# Altium PCB OFP_MCM_v1.61.PcbDoc (part 6 of 8)
Units mil, origin at the board's own origin, x right, y up, seen from the top; angles counter-clockwise.
Board outline 4330.71 x 4724.41 mil, 4 copper layers (Top Layer, Layer 1, Layer 2, Bottom Layer), stack 62.047 mil thick; 384 components, 287 nets, 1339 pads, 554 vias.
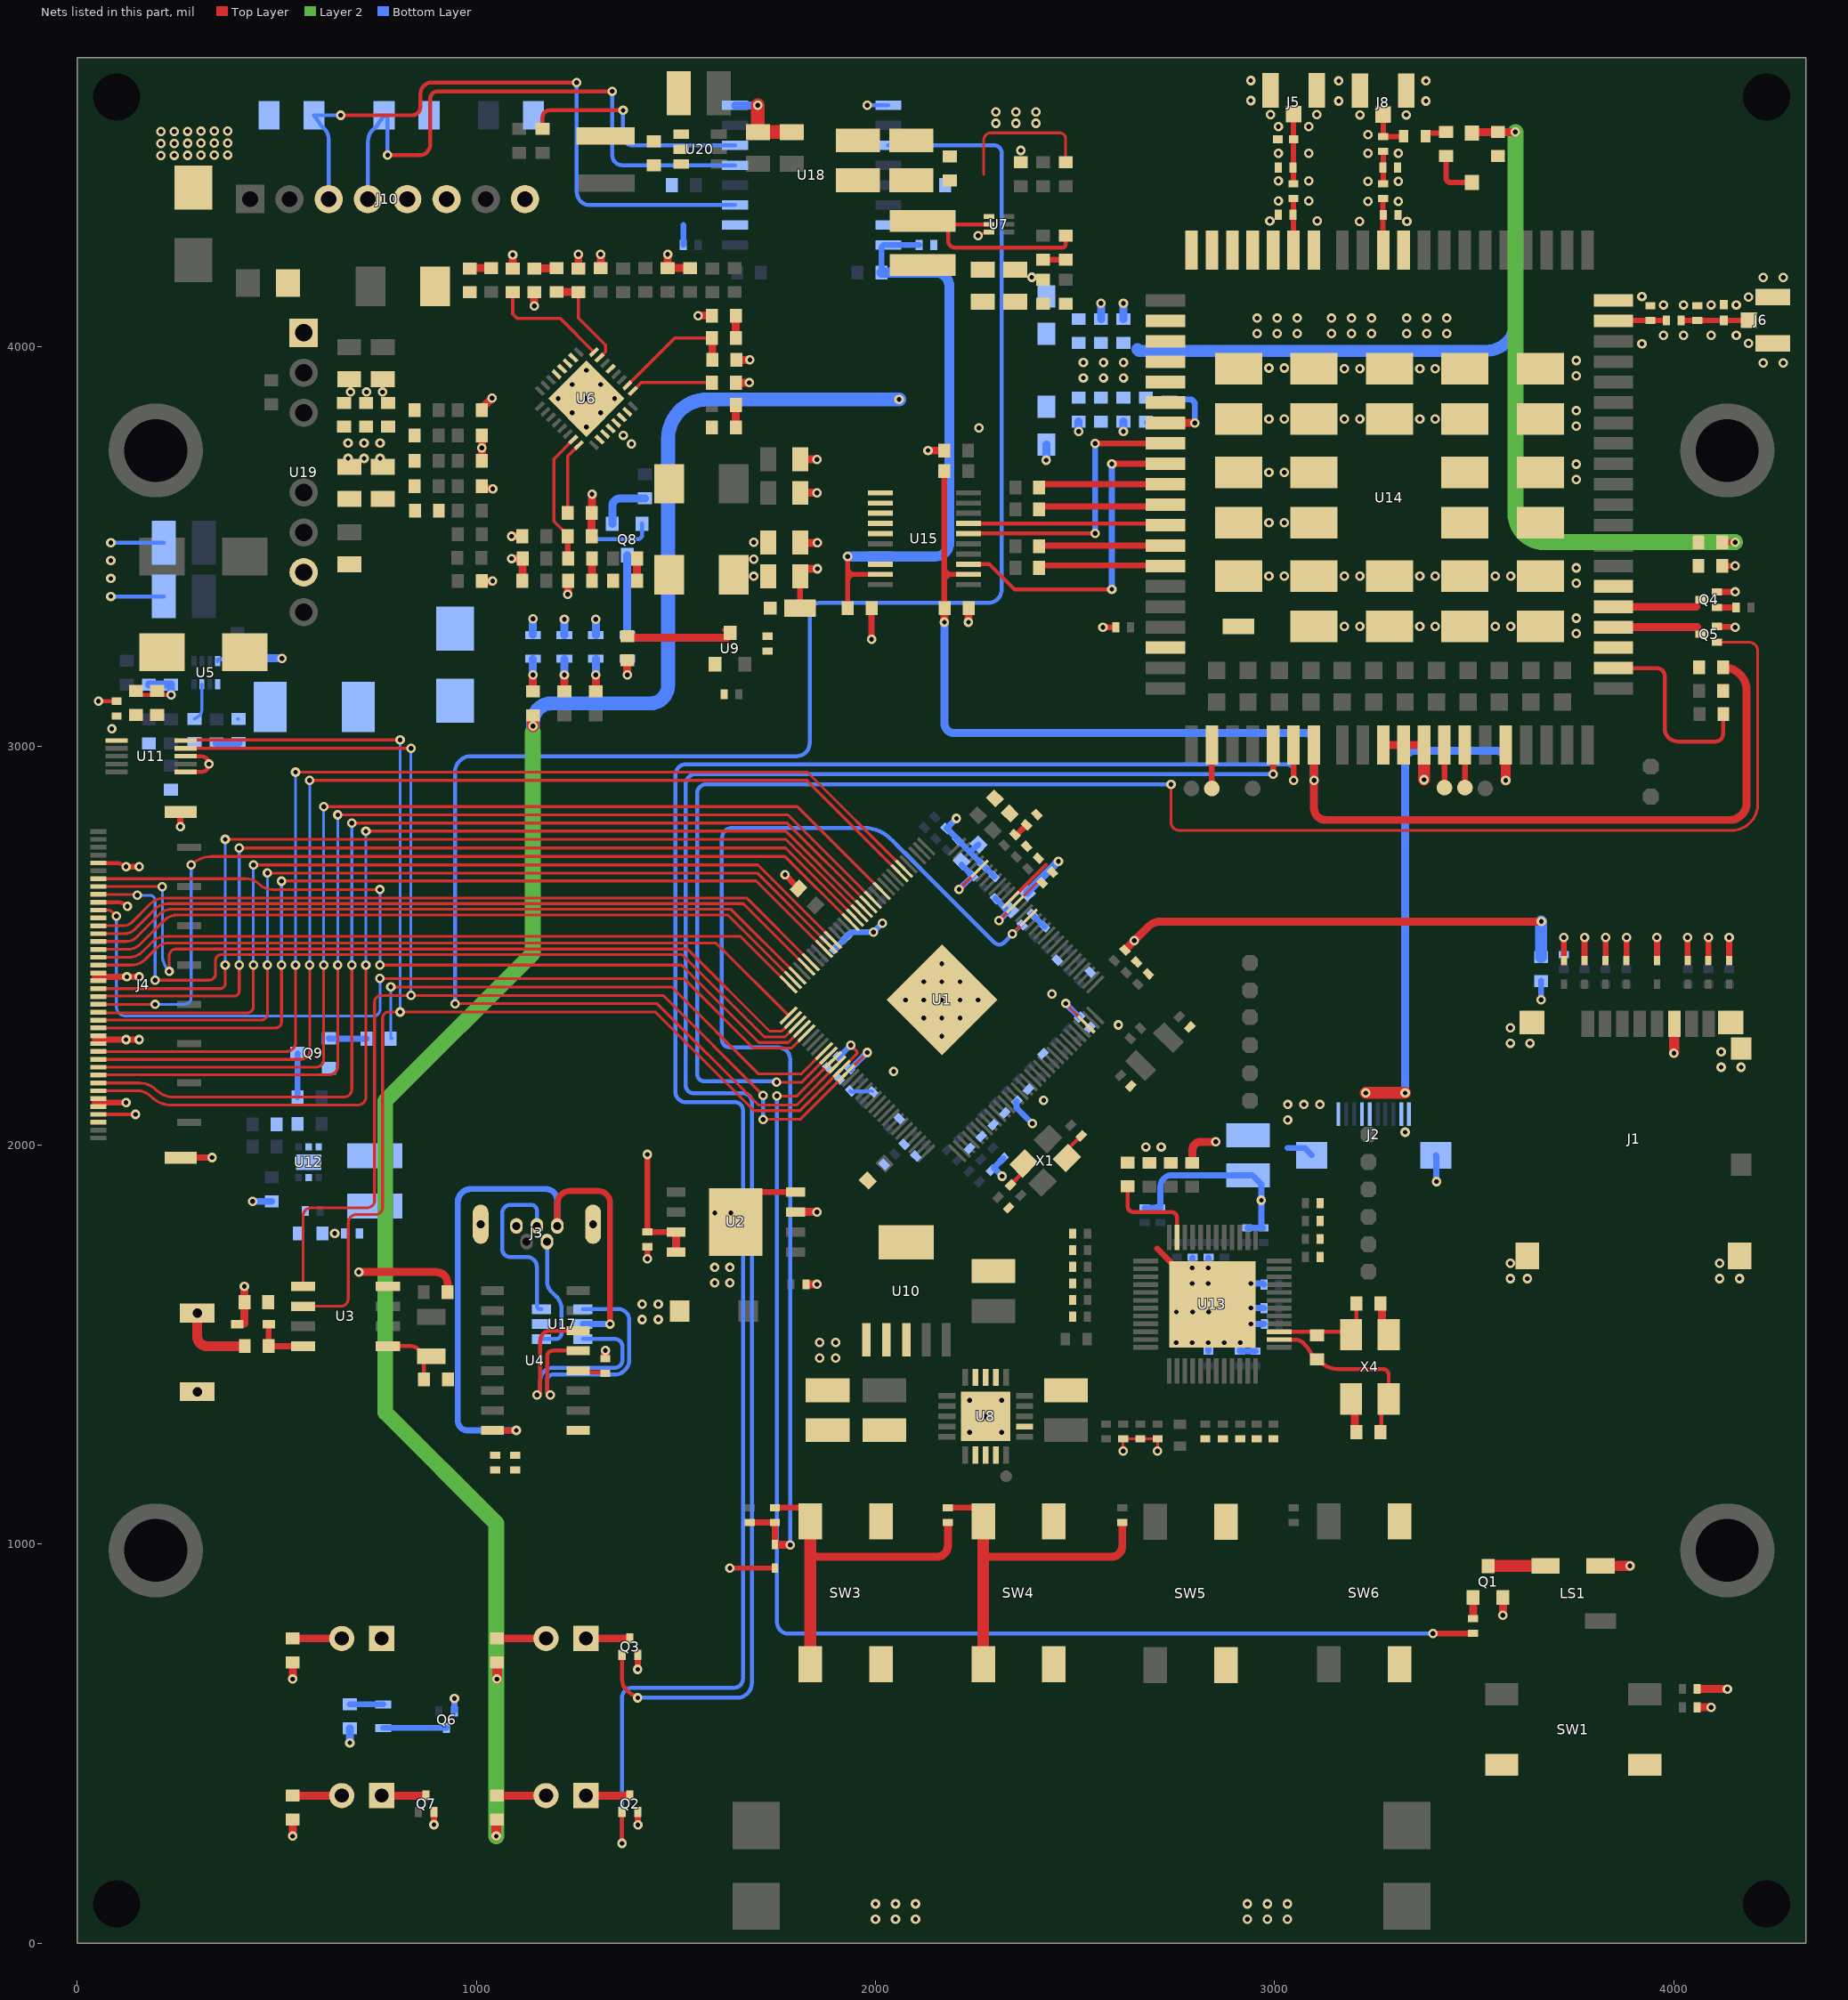
[diagram p5: the nets of this part, all layers, seen from the top]

## Via types
v1: diameter 23.62, hole 11.81, Top Layer to Bottom Layer, tented both sides, 554 vias

## Nets (pads, with @x,y where several pads share a name; then routed paths per layer and width w, separated by ;. In a path a pad name is that pad's centre, name@x,y a point inside that pad or via, vN(x,y) a via of type N, cw(c..) or ccw(c..) an arc to the next point about the centre after c; other vN are vias at no path point) (continued)
+3.3V: C4.2 C7.2 C9.2 C66.1 C67.2 C68.2 C87.2 C93.2 C94.2 C95.2 C140.2 C150.1 D9.1 D13.2 J4.4 J4.31 L3.2 LS1.1 R1.2 R8.2 R10.2 R18.1 R19.1 R20.1 R21.1 R28.1 R53.1 R77.2 R81.2 R120.2 R121.2 R124.2 U2.3 U2.7 U2.8 U9.3 U11.1 U15.19 U18.16 | length 4208.3
  Top Layer w10: J4.4@52.95,2076.77 v1(146.33,2076.77) ; J4.31@52.95,2608.27 100.22,2608.27 cw(c100.22,2572.35) 114.27,2605.4 cw(c100.22,2572.35) v1(125.61,2597.75) ; 416.65,1550.94 ccw(c416.65,1553.06) 418.77,1553.06 ; U9.3@1619.83,3290 cw(c1619.83,3267.83) U9.3@1635.51,3283.51 ; R28.1@2624.51,2488.26 R28.1@2627.65,2491.4
  Top Layer w12: C140.2@1930,3345 1930,3412.48 ; v1(1930,3474.36) 1930,3446.48 ; 1932,3429.48 1947,3429.48 ; U15.19@1997.2,3429.48 1947,3429.48 ; 1930,3412.48 cw(c1947,3412.48) 1947,3429.48 ; 1930,3412.48 1930,3446.48 ; 1930,3446.48 ccw(c1947,3446.48) 1947,3429.48
  Top Layer w15: C7.2@1428.32,1782.09 v1(1428.32,1976.4) ; C7.2@1437,1783.59 1438.5,1782.09 U2.7@1500.59,1782.09
  Top Layer w20: 418.77,1553.06 C9.2@418.77,1606.08 v1(418.77,1645.92) ; v1(540,268.3) R121.2@540,310.08 ; v1(540,662) R77.2@540,703.78 ; v1(705.4,1681.8) 898.7,1681.8 cw(c898.7,1652.46) 928.04,1652.46 R20.1@928.04,1631.46 ; v1(1088.21,3469.25) R53.1@1115.54,3469.25 ; C66.1@1115.34,3413.58 1115.54,3413.77 R53.1@1115.54,3469.25 ; R53.1@1115.73,3469.44 R53.1@1115.54,3469.25 ; R81.2@1377.95,3275 1382.34,3270.61 U9.3@1628.86,3270.61 ; U2.8@1500.59,1732.09 U2.7@1500.59,1782.09 ; U2.3@1799.79,1832.09 1853,1832.09 v1(1853,1832) ; R10.2@1828.29,1651 v1(1853,1651) ; R28.1@2627.65,2491.4 2627.65,2491.81 v1(2648.31,2512.47) 2682.31,2546.47 cw(c2714.92,2513.92) 2714.92,2560 v1(3667.87,2560) ; R1.2@4062.8,637.02 v1(4134,637.02)
  Top Layer w25: LS1.1@3816.24,945.48 v1(3890,945.48)
  Bottom Layer w10: v1@681.3,500.5 ccw(c681.3,502.22) v1(683.02,502.22)
  Bottom Layer w15: R124.2@2014.93,4186.01 2014.93,4250.63 2019.24,4254.94 U18.16@2031.93,4254.94 C150.1@2109.24,4254.94
  Bottom Layer w20: v1(683.02,502.22) R120.2@683.02,538.51
  Bottom Layer w25: v1(1930,3474.36) 2150.22,3474.36 ccw(c2150.22,3508.75) 2184.61,3508.75 2184.61,4151.79 ccw(c2150.39,4151.79) 2150.39,4186.01 R124.2@2014.93,4186.01
  Bottom Layer w30: C4.2@3667.58,2471.21 v1@3667.58,2560
  other v1: 86.64,3043.14 1695,3425 1695,3467.5 1695,3510
+3.8V: C81.2 C82.2 C83.2 C100.1 C101.2 C102.2 C103.2 C105.1 C106.2 C107.2 C108.2 C143.2 D11.1 L5.2 R61.2 R78.2 R97.2 R98.2 R99.2 R114.2 U14.57 U14.58 U14.59 U14.60 | length 7954.8
  Top Layer w15: R99.2@4121.5,3510.1 v1@4153.29,3510.1
  Top Layer w20: D11.1@3493.68,4535.67 3496.01,4538 C143.2@3559,4538 v1(3603,4538)
  Top Layer w25: v1(1049.81,268.3) 1049.81,308.08 R97.2@1051.81,310.08 ; v1(1051.81,662) R98.2@1051.81,703.78
  Top Layer w30: v1(1141.73,3049.73) R78.2@1141.73,3076.3
  Layer 2 w40: v1(1049.81,268.3) 1049.81,662 1049.81,1052.01 771.67,1330.15 771.67,2110.68 1141.73,2480.74 1141.73,3034.73 ; v1(3603,4538) 3603,3583 ccw(c3675.75,3583) 3675.75,3510.25 v1(4153.44,3510.25)
  Bottom Layer w30: 2656.44,3994.37 ccw(c2660.81,3994.37) 2660.81,3990 3530,3990 ccw(c3530,4063) 3603,4063 v1(3603,4538)
  Bottom Layer w35: v1(1141.73,3049.73) 1141.73,3060.25 cw(c1187.84,3060.25) 1187.84,3106.36 1435.04,3106.36 ccw(c1435.04,3151.56) 1480.24,3151.56 1480.24,3769.71 cw(c1578.54,3769.71) 1578.54,3868 v1(2059,3868)
  other v1: 2520.64,3922 2570.88,3922 2621,3922 2520.64,3960.68 2570.88,3960.68 2621,3960.68
+5V: C50.2 C51.2 C52.2 C57.2 C58.2 C59.2 C78.2 C79.2 C80.2 C89.2 C96.2 C97.2 C104.2 D12.2 J2.1 L1.2 L6.1 R41.2 R62.1 R69.2 R70.2 R71.2 R72.2 R82.2 R88.1 R96.2 U6.12 U6.13 U6.28 U6.29 U7.1 U10.1 U10.2 U12.2 | length 503.4
  Top Layer w7: 2270.7,4431.94 2270.7,4516.94 cw(c2289.75,4516.94) 2289.75,4536 2461,4536 cw(c2461,4520.74) 2476.26,4520.74 R62.1@2476.26,4461.94
  Top Layer w15: v1@2569.7,3297.25 R96.2@2601.5,3297.25
  Top Layer w20: R88.1@2793.18,1955.22 ccw(c2793.18,1956.23) 2794.19,1956.23 2794.19,1988.36 cw(c2813.83,1988.36) 2813.83,2008 v1(2851.93,2008)
  other v1: 1859.76,1466.32 1900,1466.32 1859.76,1505 1900,1505 3032.54,2062.78 3032.54,2101.46 3072.79,2101.46 3112.9,2101.46 2569.56,3297.1 678.42,3720.32 718.66,3720.32 758.78,3720.32 1388.63,3756.52 678.42,3759 718.66,3759 758.78,3759 1368.2,3778.16 2301.66,4560 2351.91,4560 2402.03,4560 2301.66,4588.68 2351.91,4588.68 2402.03,4588.68
+5VUSB: C23.2 C24.2 J3.1 U4.16 U17.5 | length 1700.1
  Top Layer w15: U4.16@1040.3,1284.42 1100,1284.42 v1(1100,1285) ; J3.1@1202.69,1797.22 1202.69,1852.69 cw(c1235,1852.69) 1235,1885 1305,1885 cw(c1305,1855) 1335,1855 v1(1335,1551.4)
  Bottom Layer w15: v1(1100,1285) 977.97,1285 cw(c977.97,1309.64) 953.33,1309.64 953.33,1856.42 cw(c986.92,1856.42) 986.92,1890 1173.3,1890 cw(c1173.3,1860.61) 1202.69,1860.61 J3.1@1202.69,1797.22 ; U17.5@1266.5,1551.4 1323.14,1551.4
+EXT: C139.2 R103.2 R104.2 R111.2 U14.7 U15.2 | length 3440.6
  Top Layer w12: 2172.11,3410.19 cw(c2191.4,3410.19) 2191.4,3429.48 ; 2172.11,3448.77 ccw(c2191.4,3448.77) 2191.4,3429.48 ; U15.2@2232.67,3429.48 2191.4,3429.48
  Top Layer w15: R104.2@2172.11,3688.34 2172.11,3410.19 2172.11,3350.75 ccw(c2173.11,3350.75) C139.2@2173.11,3349.75
  Top Layer w20: C139.2@2171.86,3350.72 2172.18,3350.4 2172.18,3310.26 v1(2172.5,3309.94) ; U14.7@3098.42,3001.97 v1(3098.42,2913.39) 3098.42,2844.07 ccw(c3128.17,2844.07) 3128.17,2814.33 4139.33,2814.33 ccw(c4139.33,2857.4) 4182.4,2857.4 4182.4,3137.99 ccw(c4123.54,3137.99) R103.2@4123.54,3196.85
  Bottom Layer w20: v1(2172.5,3309.94) 2172.5,3056.7 ccw(c2197.01,3056.7) 2197.01,3032.19 3075.43,3032.19 cw(c3075.43,3009.2) 3098.42,3009.2 v1(3098.42,2913.39)
+USIM: J2.4 J2.5 U14.14 | length 1349.7
  Top Layer w25: v1(3578.74,2913.39) U14.14@3578.74,3001.97
  Top Layer w30: v1(3228.31,2130.47) v1(3326.74,2130.47)
  Bottom Layer w20: v1(3326.74,2130.47) 3326.74,2963.1 cw(c3351.64,2963.1) 3351.64,2988 3553.54,2988 cw(c3553.54,2962.8) 3578.74,2962.8 v1(3578.74,2913.39)
A_MASTER: 
AGND: C19.1 C20.1 C21.1 C22.1 R31.1 R37.1 U1.116 | length 274.3
  Top Layer w7: R31.1@2350.01,2776.33 R31.1@2352.32,2776.33
  Top Layer w9: U1.116@2338.75,2614.06 2427.21,2702.53
  Top Layer w15: R31.1@2352.32,2776.33 R37.1@2377.9,2801.92
  Bottom Layer w20: C20.1@2379.55,2632.18 v1@2457.81,2710.44
  other v1: 2458.05,2710.44
ANT_DIV: C142.2 R109.2 U14.35 | length 133.6
  Top Layer w7: U14.35@3848.42,4064.96 cw(c3849.39,4064.96) U14.35@3849.39,4065.93
  Top Layer w13.5: U14.35@3849.39,4065.93 R109.2@3981.5,4065.93
ANT_GNSS: C146.2 R113.2 U14.47 | length 129.3
  Top Layer w7: U14.47@3271.34,4242.44 U14.47@3271.65,4242.13
  Top Layer w13.5: U14.47@3271.34,4242.44 R113.2@3271.34,4371.27
ANT_MAIN: C138.2 R101.2 U14.49 | length 129.4
  Top Layer w13.5: R101.2@3046.56,4371.27 3046.56,4242.81 U14.49@3047.24,4242.13
AP_RDY: pad.2@2842.52,2893.39 U14.2 | length 108.6
  Top Layer w15: pad.2@2842.52,2893.39 U14.2@2842.52,3001.97
ATSAM_RX: D18.1 J10.4 U18.5 | length 1513.8
  Top Layer w10: v1(777.56,4480) 857.64,4480 ccw(c857.64,4506.6) 884.24,4506.6 884.24,4621.46 cw(c902.78,4621.46) 902.78,4640 v1(1340.55,4640)
  Bottom Layer w10: J10.4@728.34,4370.08 728.34,4514.83 cw(c768.82,4514.83) 743.47,4546.38 747.44,4549.57 D18.1@768.82,4580 cw(c768.82,4571.26) 777.56,4571.26 v1(777.56,4480) ; v1(1340.55,4640) 1340.55,4479.54 ccw(c1365.15,4479.54) 1365.15,4454.94 U18.5@1648.07,4454.94
ATSAM_TX: D17.1 J10.3 U18.3 | length 1630.4
  Top Layer w10: v1(660,4580) 838.25,4580 ccw(c838.25,4601.75) 860,4601.75 860,4634.27 cw(c887.83,4634.27) 887.83,4662.1 v1(1251.39,4662.1)
  Bottom Layer w10: J10.3@629.92,4370.08 629.92,4520.16 ccw(c593.23,4520.16) 614.6,4549.98 D17.1@593.23,4580 v1(660,4580) ; v1(1251.39,4662.1) 1251.39,4388.02 ccw(c1284.47,4388.02) 1284.47,4354.94 U18.3@1648.07,4354.94
AVCC: C19.2 C20.2 R32.2 R33.1 U1.115 | length 304.2
  Top Layer w7: v1(2308.99,2562.06) U1.115@2349.87,2602.94 2406.8,2659.87 2414.58,2659.87 C19.2@2416.17,2658.28
  Bottom Layer w7: C20.2@2327.96,2589.75 C20.2@2336.68,2589.75
  Bottom Layer w15: R32.2@2300.38,2617.34 C20.2@2327.96,2589.75 ; v1@2309.2,2562.06 C20.2@2332.93,2585.79 ; R33.1@2353.47,2109.78 2351,2107.3 2351,2105.18 2353.47,2102.71 2353.47,2092.89 2374.7,2071.67 v1(2392.79,2053.57)
B_MASTER: 
BOOT: R110.1 U14.115 | length 497.2
  Top Layer w10: U14.115@3848.42,3194.88 3957.12,3194.88 cw(c3957.12,3175) 3977,3175 3977,3044 ccw(c4010,3044) 4010,3011 4104,3011 ccw(c4104,3030) 4123,3030 4123,3079 cw(c4124,3079) R110.1@4124,3080
BUZZER_EN: R17.1 U1.43 | length 3256.7
  Top Layer w7: v1(1753.11,2122.87) 1803.01,2122.87 U1.43@1893.34,2213.2
  Top Layer w15: v1(3396.42,775.76) 3396.78,776.12 R17.1@3496.57,776.12 ; R17.1@3496.75,776.12 R17.1@3496.57,776.12 ; R17.1@3496.93,776.48 R17.1@3496.57,776.12
  Bottom Layer w10: v1(1753.11,2122.87) 1753.11,804.51 ccw(c1781.62,804.51) 1781.62,776 3396.17,776 v1(3396.42,775.76)
CH_3.3V: C13.2 U4.4 | length 69.9
  Top Layer w10: U4.4@1254.85,1434.82 1259.52,1430.15 C13.2@1322.81,1430.15
CH_U_N: U4.6 U17.6 | length 669.4
  Top Layer w10: v1(1151.69,1373.82) ccw(c1151.69,1382.13) 1160,1382.13 1160,1510 cw(c1184.82,1510) 1184.82,1534.82 U4.6@1254.85,1534.82
  Bottom Layer w10: v1(1151.69,1373.82) ccw(c1151.69,1382.13) 1160,1382.13 1160,1409.81 cw(c1192.01,1409.81) 1192.01,1441.82 1345.77,1441.82 ccw(c1345.77,1461.93) 1365.88,1461.93 1365.88,1494.6 ccw(c1346.48,1494.6) 1346.48,1514 U17.6@1266.5,1514
CH_U_P: U4.5 U17.4 | length 695.1
  Top Layer w10: v1(1185.31,1373.82) cw(c1185.31,1382.13) 1177,1382.13 1177,1470 cw(c1191.82,1470) 1191.82,1484.82 U4.5@1254.85,1484.82
  Bottom Layer w10: v1(1185.31,1373.82) cw(c1185.31,1382.14) 1177,1382.14 1177,1409.81 cw(c1192.01,1409.81) 1192.01,1424.82 1345.77,1424.82 ccw(c1345.77,1461.93) 1382.88,1461.93 1382.88,1561.5 ccw(c1355.58,1561.5) 1355.58,1588.8 U17.4@1266.5,1588.8
D_N: J3.2 U17.1 | length 298.9
  Bottom Layer w10: U17.1@1163.35,1514 1198.4,1514.01 ccw(c1198.4,1528.92) 1213.31,1528.92 1213.31,1588.8 ccw(c1169.05,1588.8) 1200.35,1620.1 1188.04,1632.41 cw(c1214.45,1658.82) 1177.1,1658.82 J3.2@1177.1,1757.85
D_P: J3.3 U17.3 | length 461.2
  Bottom Layer w10: J3.3@1151.51,1797.22 1151.51,1835.54 ccw(c1137.06,1835.54) 1137.06,1850 1085,1850 ccw(c1085,1830) 1065,1830 1065,1739.12 ccw(c1084.58,1739.12) 1084.58,1719.54 1126.43,1719.54 cw(c1126.43,1694.46) 1151.51,1694.46 1151.51,1600.65 1151.51,1597.39 ccw(c1160.1,1597.39) 1160.1,1588.8 U17.3@1163.35,1588.8
DBG_RXD: pad.2@3425.2,2895.36 U14.11 | length 108.6
  Top Layer w15: pad.2@3425.2,2893.39 pad.2@3425.2,2895.36 U14.11@3425.2,3001.97
DBG_TXD: pad.2@3476.38,2895.36 U14.12 | length 108.6
  Top Layer w15: pad.2@3476.38,2893.39 pad.2@3476.38,2895.36 U14.12@3476.38,3001.97
EC_CTS: R108.1 U14.64 | length 316.4
  Top Layer w15: R108.1@2410,3655.51 U14.64@2726.38,3655.51
EC_DCD: U14.63 U15.3 | length 834
  Top Layer w10: U15.3@2232.67,3455.07 2285.09,3455.07 2347.77,3392.39 v1(2592,3392.39)
  Top Layer w15: v1(2592,3706.69) U14.63@2726.38,3706.69
  Bottom Layer w15: v1(2592,3392.39) v1(2592,3706.69)
EC_DTR: U14.66 U15.7 | length 495.5
  Top Layer w7: U14.66@2722.1,3557.43 U14.66@2726.38,3553.15
  Top Layer w10: U15.7@2232.67,3557.43 U14.66@2722.1,3557.43
EC_PWR: Q4.3 R99.1 R100.1 U14.21 | length 207.6
  Top Layer w20: U14.21@3848.42,3348.43 4056.04,3348.43
EC_RI: U14.62 U15.6 | length 719.4
  Top Layer w7: U15.6@2232.67,3531.84 U15.6@2233.31,3532.48
  Top Layer w10: U15.6@2233.31,3532.48 v1(2550.2,3532.48)
  Top Layer w15: v1(2550.2,3757.88) U14.62@2726.38,3757.88
  Bottom Layer w15: v1(2550.2,3532.48) v1(2550.2,3757.88)
EC_RST: Q5.3 R103.1 U14.20 | length 209.9
  Top Layer w20: U14.20@3848.42,3297.25 4058.33,3297.25
EC_RTS: R107.1 U14.65 | length 321.1
  Top Layer w7: R107.1@2410,3592.82 R107.1@2416.98,3599.8 ; U14.65@2721.84,3599.8 U14.65@2726.38,3604.33
  Top Layer w15: R107.1@2416.98,3599.8 U14.65@2721.84,3599.8
EC_RXD: R105.1 U14.68 | length 316.9
  Top Layer w7: U14.68@2725.14,3452.02 U14.68@2726.38,3450.79
  Top Layer w15: R105.1@2410,3452.02 U14.68@2725.14,3452.02
EC_STATUS: LED8.2 U14.61 | length 190.7
  Top Layer w7: v1(2800,3808.99) v1@2800,3809.06
  Top Layer w20: U14.61@2726.38,3809.06 v1@2800,3809.06
  Bottom Layer w15: LED8.2@2736.49,3868.05 2786.98,3868.05 cw(c2786.98,3855.03) 2800,3855.03 v1(2800,3808.99)
EC_TXD: R106.1 U14.67 | length 318.1
  Top Layer w7: R106.1@2410,3506.16 R106.1@2414.18,3501.97
  Top Layer w15: R106.1@2414.18,3501.97 U14.67@2726.38,3501.97
GND: C1.1 C2.1 C3.1 C4.1 C5.1 C6.1 C7.1 C8.2 C9.1 C10.1 C11.1 C12.1 C13.1 C14.1 C15.1 C16.1 C17.1 C18.1 C23.1 C24.1 C25.1 C26.1 C27.1 C28.1 C29.1 C30.1 C31.1 C32.1 C33.1 C34.1 C35.1 C36.1 C37.1 C38.1 C39.1 C40.1 C41.1 C42.1 C43.1 C44.1 C45.1 C46.1 C47.1 C48.1 C49.1 C50.1 C51.1 C52.1 C56.1 C57.1 C58.1 C59.1 C60.1 C61.1 C62.2 C63.2 C64.1 C67.1 C68.1 C69.2 C70.2 C71.1 C74.1 C76.1 C77.1 C78.1 C79.1 C80.1 C81.1 C82.1 C83.1 C84.1 C85.2 C86.2 C87.1 C88.1 C89.1 C90.1 C91.1 C92.1 C93.1 C94.1 C95.1 C96.1 C97.1 C98.1 C99.1 C100.2 C101.1 C102.1 C103.1 C104.1 C105.2 C106.1 C107.1 C108.1 C109.1 C110.1 C111.1 C112.1 C113.1 C114.1 C115.1 C116.1 C117.1 C118.1 C119.1 C120.1 C121.1 C122.1 C123.1 C124.1 C125.1 C126.1 C127.1 C128.1 C129.1 C130.1 C131.1 C132.1 C133.1 C134.1 C135.1 C136.1 C137.1 C138.1 C139.1 C140.1 C141.1 C142.1 C143.1 C145.1 C146.1 C150.2 C156.1 C157.2 C158.2 D1.1 D2.1 D3.1 D4.1 D5.1 D6.1 D7.1 D8.1 D10.1 D12.1 D13.1 D15.2 D16.2 J1.6 J1.DN J1.SH1 J1.SH2 J1.SH3 J1.SH4 J2.9 J2.10 J2.MP1 J2.MP2 J3.5 J3.SH1 J3.SH2 J4.3 J4.5 J4.6 J4.13 J4.14 J4.21 J4.22 J4.29 J4.36 J4.49 J4.50 J5.2 J5.3 J6.2 J6.3 J8.2 J8.3 LED1.1 LED2.2 LED3.2 LED4.2 Q1.2 Q2.1 Q3.1 Q4.1 Q5.1 Q6.1 Q7.1 Q8.2 Q9.2 R9.2 R29.1 R30.1 R37.2 R43.2 R44.1 R45.1 R48.2 R54.2 R60.2 R63.1 R64.1 R68.1 R73.1 R74.1 R75.1 R76.1 R85.1 R86.1 R87.1 R89.1 R90.1 R91.1 R95.1 R100.2 R102.2 R127.2 SW1.3 SW1.4 SW2.2 SW3.1 SW3.2 SW4.1 SW4.2 SW5.1 SW5.2 SW6.1 SW6.2 U1.129 U2.4 U2.9 U3.4 U4.1 U5.4 U6.11 U6.14 U6.21 U6.27 U6.33 U7.3 U8.2 U8.3 U8.4 U8.12 U8.13 U8.14 U8.17 U8.21 U9.1 U10.3 U10.6 U11.6 U11.8 U12.5 U12.7 U13.49 U14.8 U14.9 U14.10 U14.19 U14.22 U14.36 U14.46 U14.48 U14.50 U14.51 U14.52 U14.53 U14.54 U14.56 U14.72 U14.85 U14.86 U14.87 U14.88 U14.89 U14.90 U14.91 U14.92 U14.93 U14.94 U14.95 U14.96 U14.97 U14.98 U14.99 U14.100 U14.101 U14.102 U14.103 U14.104 U14.105 U14.106 U14.107 U14.108 U14.109 U14.110 U14.111 U14.112 U15.11 U17.2 U18.9 U18.15 U19.7 X1.2 X1.4 X4.2 X4.4 | length 6857.6
  Top Layer w7: v1(2256.66,4278.46) 2261.16,4278.46 2267.34,4284.65 2281.48,4284.65 U7.3@2283.88,4287.05 ; v1(2620.14,1233.34) R68.1@2620.14,1264.08 R87.1@2663,1264.08 C117.1@2706.52,1264.08 v1(2706.52,1233.34) ; U13.49@2791.13,1686.36 2865.3,1658.66 2911.91,1641.25 U13.49@2843.78,1601.05 cw(c2843.78,1651.65) 2842.18,1601.08 cw(c2843.78,1651.65) 2840.83,1601.14 cw(c2843.78,1651.65) 2793.2,1650.17 cw(c2843.78,1651.65) 2793.18,1651.65 v1(2793.18,1653.17) ; Q5.1@4108.23,3299.32 Q5.1@4108.52,3299.61
  Top Layer w10: J4.36@52.95,2706.69 101.22,2706.69 cw(c101.22,2697.1) 105.66,2705.6 v1(122.26,2697.1) ; v1(53.13,3112) C95.1@98.46,3112 ; C93.1@146.87,3137.5 ccw(c156.76,3137.5) 156.76,3127.6 v1(234.96,3127.6) ; U11.6@271.68,2934.82 310.32,2934.82 ccw(c310.32,2954.51) v1(330,2954.51) ccw(c310.31,2954.51) 310.31,2974.19 U11.8@271.68,2974.19 ; R76.1@1013.38,3650.29 R76.1@1013.67,3650 ; Q3.1@1404.19,722.44 Q3.1@1404.59,722.03 ; C2.1@2338.04,1899.94 2370.91,1932.81 X1.2@2370.91,1953.67 ; X1.4@2479.48,1967.59 2479.48,1987.57 C1.1@2515.05,2023.14 ; v1(4093,591) v1@4093,591.15
  Top Layer w12: v1@1635.01,939.87 1747.9,939.87 D10.1@1748.03,939.75
  Top Layer w15: 43.91,2106.55 v1(122.26,2106.55) ; 43.91,2264.03 v1(122.26,2264.03) v1(155.35,2264.03) ; 43.91,2421.51 122.26,2421.51 v1(155.35,2421.51) ; v1(122.26,2697.1) v1(155.35,2697.1) ; v1(258.32,2797.72) 258.32,2833.32 J4.49@259.64,2834.65 ; J4.50@259.64,1968.5 v1(337.99,1968.5) ; v1(893.7,297.11) Q7.1@893.7,328.74 ; v1@1404.19,297.11 Q2.1@1404.19,328.74 ; v1(1404.19,686.22) 1404.19,721.62 Q3.1@1404.59,722.03 ; v1(1428.32,1715.02) C7.1@1428.32,1745.09 ; U2.9@1650.18,1807.1 1650.18,1822.66 1709.61,1882.09 U2.4@1799.8,1882.09 ; v1(1773.28,2677.36) 1799.38,2651.25 C37.1@1807.01,2642.62 ; D13.1@1810.8,3345 1811,3345 C68.1@1811,3425 C68.1@1812.13,3423.87 ; C67.1@1811,3509.99 C67.1@1812.13,3508.87 ; v1(1990,3267.2) C140.1@1990,3345 ; 2705.6,1740.6 2743.17,1701.82 2790.96,1652.49 U13.49@2791.69,1651.73 ; D1.1@3724.32,2461.58 v1(3724.32,2520) ; D6.1@3776.27,2461.58 v1(3776.27,2520) ; D7.1@3828.72,2461.58 v1(3828.72,2520) ; D3.1@3881.18,2461.58 v1(3881.18,2520) ; D2.1@3957.58,2461.58 v1(3957.58,2520) ; D4.1@4034.48,2461.58 v1(4034.48,2520) ; D5.1@4086.45,2461.58 v1(4086.45,2520) ; Q4.1@4108.23,3385.93 v1(4153.29,3385.93) ; Q5.1@4108.52,3299.61 4109.85,3298.28 4152.25,3298.28 v1(4153.29,3297.25) ; R100.2@4121.5,3451.05 v1@4153.29,3451.05 ; D8.1@4138.46,2461.58 v1(4138.46,2520)
  Top Layer w20: C64.1@1013.38,3413.06 v1(1040.71,3413.06) ; R76.1@1013.67,3644 v1(1041,3644) ; R75.1@1013.67,3718.94 v1(1013.67,3746.27) R74.1@1013.67,3777.77 ; R73.1@1020.21,3852.16 v1(1039.54,3871.49) ; v1(1088.02,3525.23) R54.2@1115.35,3525.23 ; C71.1@1091.11,4196.36 v1(1091.11,4230.47) ; v1(1145,4102.24) C63.2@1145,4136.36 ; v1@1229.1,3379.86 C70.2@1229.1,3413.58 ; C62.2@1255.54,4196.36 v1@1255.54,4230.47 ; C69.2@1288.85,3525.23 C74.1@1288.85,3584 1289.27,3584.42 1289.27,3625.21 v1@1289.69,3625.64 ; R48.2@1311.48,4197.36 v1(1311.48,4231.47) ; v1(1479.29,4231.47) R64.1@1479.29,4197.36 R60.2@1534.23,4197.36 ; v1(1555.8,4077.83) C86.2@1589.92,4077.83 ; C84.1@1649.92,3910.02 v1(1684.04,3910.02) ; C85.2@1651.13,3967.16 v1(1685.25,3967.16) ; C77.1@1811,3634 v1(1853.16,3634) ; C76.1@1811,3717.74 v1(1853.16,3717.74) ; C68.1@1812.13,3443.87 v1(1854.29,3443.87) ; C67.1@1812.13,3508.87 v1(1854.29,3508.87) ; v1@2131.65,3739.84 R102.2@2171.79,3739.84 ; v1(2232.67,3309.94) 2232.89,3310.16 2232.89,3349.53 C139.1@2233.11,3349.75 ; C109.1@3201.14,1284.57 X4.4@3201.14,1341.97 ; C110.1@3264.92,1602.8 3268.7,1599.03 3268.7,1541.62 X4.2@3285.46,1524.86 ; U14.8@3271.65,3001.97 U14.9@3322.83,3001.97 U14.10@3374.01,3001.97 ; v1(3571.73,821.78) Q1.2@3571.73,866.38 ; C3.1@4061.58,591.15 v1@4093,591.15
  Top Layer w22: C13.1@1323.14,1470 v1(1323.14,1485)
  Top Layer w25: v1@4000.88,2230.88 J1.6@4000.88,2303.35
  Top Layer w30: v1(3374.01,2915.36) U14.10@3374.01,3001.97
  Bottom Layer w7: C39.1@1939.83,2133.18 1945.49,2133.18 1947.61,2133.18 C39.1@1948.66,2134.23 ; C42.1@1981.19,2134.23 1982.76,2135.79 1990.54,2135.79 C42.1@1993.02,2133.32
  Bottom Layer w10: v1(84.12,3374.49) 192.13,3374.49 C48.1@217.13,3374.49 ; v1(84.12,3509.29) C47.1@217.13,3509.29 ; v1@234.74,3127.6 v1(234.96,3127.6) ; U5.4@351.81,3212.29 351.81,3215.25 353.11,3216.55 390.02,3216.55 C49.1@396.5,3223.03 ; v1(1289.69,3630.64) ccw(c1289.69,3629.79) 1288.85,3629.79 1288.85,3538.31 ccw(c1309.34,3538.31) 1309.34,3517.83 1403.95,3517.83 ccw(c1403.95,3529.23) 1415.35,3529.23 Q8.2@1415.35,3556.43 ; C39.1@1937.36,2135.65 C39.1@1939.83,2133.18 ; C39.1@1945.49,2133.18 1946.81,2134.5 C42.1@1980.92,2134.5 ; v1(1979.07,4604.94) U18.9@2031.93,4604.94
  Bottom Layer w15: Q6.1@945.03,580.67 v1(945.03,613.08) ; C38.1@1897.97,2491.67 1939.96,2533.66 v1(1994.89,2533.66) v1(2017.16,2555.92) ; v1(2202.54,2818.32) 2178.19,2793.97 2181.44,2790.47 2202.93,2768.98 C34.1@2205.53,2764.51 2209.06,2760.98 2236,2734.05 ; C11.1@2258.1,2753.19 2236,2734.05 ; C31.1@2297.48,2672.56 2293.95,2676.1 C12.1@2269.42,2700.62 2236,2734.05 ; v1(2317.3,1921.68) 2296.02,1942.96 2319.55,1966.49 C17.1@2319.76,1966.49 ; C26.1@2393.1,2577.95 2396.19,2573.97 2419.99,2550.17 C27.1@2423.47,2546.58 ; C124.1@2673.72,1842.45 C126.1@2713.61,1842.44 2713.61,1895.8 cw(c2741.91,1895.8) 2741.91,1924.1 C104.1@2933,1924.1 2943.89,1924.1 2966.39,1901.6 v1(2966.39,1861.49) 2966.39,1797.04 ccw(c2971.05,1797.04) 2971.05,1792.38 C128.1@2931.16,1792.37 ; v1(2793.18,1691.85) 2793.74,1692.42 2793.74,1717.81 C112.1@2794.31,1718.38 ; v1@2833.43,1510.77 2833.68,1510.51 2833.68,1483.98 C130.1@2833.94,1483.72 ; v1(2833.43,1691.85) 2833.81,1692.24 2833.81,1717.99 C113.1@2834.2,1718.38 ; v1@2913.91,1510.77 2913.3,1510.15 2913.3,1484.34 C134.1@2912.68,1483.72 C132.1@2952.05,1483.72 ; v1@2935.1,1551.67 v1(2940.1,1551.67) 2972.39,1551.67 C116.1@2973.89,1551.84 ; v1@2935.1,1591.91 v1(2940.1,1591.91) 2971.61,1591.91 C115.1@2973.11,1591.21 ; v1@2935.1,1653.17 v1(2940.1,1653.17) 2971.61,1653.17 C125.1@2973.11,1650.26 ; 3032.54,1992.74 3074.46,1992.74 J2.MP2@3092.49,1974.71 ; J2.MP1@3403.51,1974.71 3405,1973.22 v1(3405,1908.31) ; v1(3667.58,2364.12) C4.1@3667.58,2411.21
  Bottom Layer w17: v1(439.14,1858.85) C98.1@487.5,1858.85
  Bottom Layer w20: R43.2@179.63,3153.36 R45.1@234.74,3153.36 v1@234.74,3127.6 ; C49.1@396.5,3223.03 400.23,3219.3 v1(513.25,3219.3) ; LED2.2@1141.73,3278.67 v1(1141.73,3318.2) ; LED3.2@1220.47,3277.56 v1(1220.47,3317.09) ; LED4.2@1299.21,3277.56 v1(1299.21,3317.09) ; v1(2427.72,3715.75) C105.2@2427.72,3755.28 ; v1(2508.62,3788) C106.1@2508.62,3812.52 ; C102.1@2564.8,4069.37 v1(2564.8,4108.9) ; v1(2620.98,3788) C108.1@2620.98,3812.52 ; C103.1@2620.98,4069.37 v1(2620.98,4108.9)
  other v1: 1999.76,60 2050,60 2100.12,60 2931.38,60 2981.49,60 3031.74,60 1999.76,98.68 2050,98.68 2100.12,98.68 2931.38,98.68 2981.49,98.68 3031.74,98.68 1404.59,296.71 1635.01,940 2235.8,1280.31 2316.02,1280.31 2275.91,1320.42 2235.8,1360.53 2316.02,1360.53 2752.94,1504.77 2793.18,1504.77 2833.43,1504.77 2873.67,1504.77 2913.91,1504.77 1415.37,1562.79 1455.62,1562.79 2753.72,1581.71 2793.96,1581.71 2834.2,1581.71 1415.37,1601.47 1455.62,1601.47 2833.43,1653.17 1597.1,1654.64 1635.01,1654.64 3590.47,1665.32 3632.77,1665.32 4114.15,1665.32 4164.27,1665.32 1597.1,1693.32 1635.01,1693.32 3590.47,1704 4114.15,1704 645.09,1778.59 1597.1,1829.66 1637.34,1829.66 2677.04,1995.22 2715.72,1995.22 3326.74,2032.07 2421.11,2112.07 2045.39,2184.34 4118.29,2195 4168.4,2195 4000,2230 4118.29,2233.68 3590.47,2254.96 3639.59,2254.96 2166.14,2272.67 3590.47,2293.64 2608.49,2300.9 2120.71,2318.1 2166.14,2318.1 2211.58,2318.1 2075.28,2363.53 2120.71,2363.53 2166.14,2363.53 2211.58,2363.53 2257.01,2363.53 2441.71,2378.19 2120.71,2408.97 2166.14,2408.97 2211.58,2408.97 124.26,2421.51 2166.14,2454.4 3755.66,3281.36 3174.5,3299.09 3213.18,3299.09 3363.48,3299.09 3402.16,3299.09 3552.46,3299.09 3591.14,3299.09 3755.66,3320.05 1228.68,3379.44 3755.66,3407.35 84.12,3419.42 2985.53,3425.08 3024.21,3425.08 3174.5,3425.08 3213.18,3425.08 3363.48,3425.08 3402.16,3425.08 3552.46,3425.08 3591.14,3425.08 3755.66,3446.03 4153.44,3451.19 84.12,3464.35 2985.53,3558.93 3024.21,3558.93 3755.66,3667.19 2985.53,3684.92 3024.21,3684.92 3755.66,3705.87 2131.33,3740.16 2259,3796.75 1275.59,3799.21 3755.66,3801.05 2985.53,3818.78 3024.21,3818.78 3174.5,3818.78 3213.18,3818.78 3363.48,3818.78 3402.16,3818.78 1240.16,3834.65 1311.02,3834.65 3755.66,3839.73 1204.72,3870.08 1275.59,3870.08 1346.46,3870.08 684.5,3886.64 724.74,3886.64 764.86,3886.64 1240.16,3905.51 1311.02,3905.51 3755.66,3927.03 1275.59,3940.95 3174.5,3944.76 3213.18,3944.76 3363.48,3944.76 3402.16,3944.76 2985.53,3946.73 3024.21,3946.73 4223.43,3959.37 4273.68,3959.37 3755.66,3965.72 3919.96,4007.18 4186.99,4008.55 3974.14,4028.43 4024.26,4028.43 4093.37,4028.43 4156.28,4028.43 2955.64,4033 3005.88,4033 3056,4033 3141.86,4033 3192.1,4033 3242.22,4033 3330.58,4033 3380.83,4033 3430.94,4033 2955.64,4071.68 3005.88,4071.68 3056,4071.68 3141.86,4071.68 3192.1,4071.68 3242.22,4071.68 3330.58,4071.68 3380.83,4071.68 3430.94,4071.68 3974.14,4104.8 4024.26,4104.8 4093.37,4104.8 4156.28,4104.8 4186.99,4124.69 3919.96,4126.06 2391.33,4174.04 4223.43,4173.86 4273.68,4173.86 1255.54,4231.47 3212.21,4313.98 3331.09,4313.98 2987.8,4314.96 3106.68,4314.96 3233.47,4364.16 3309.84,4364.16 3009.06,4365.15 3085.43,4365.15 3233.47,4414.28 3309.84,4414.28 3009.06,4415.27 3085.43,4415.27 3009.06,4484.39 3085.43,4484.39 3233.47,4484.39 3309.84,4484.39 2363.91,4491.89 3233.47,4531.51 3009.06,4551.28 3085.43,4551.28 3213.58,4581.01 3329.72,4581.01 2989.17,4581.99 3105.31,4581.99 3160.41,4615.77 3378.89,4615.77 2940,4616.76 3160.41,4666.02 3378.89,4666.02 2940,4667
GND-IN: C149.1 C152.1 C153.1 C154.1 C155.1 D14.1 D17.2 D18.2 D19.2 J10.8 R126.1 U18.2 U18.8 U19.1 U20.4 | length 258.9
  Top Layer w35: v1(1705,4604.94) C155.1@1705,4538 C154.1@1790,4538
  Bottom Layer w15: C149.1@1518.41,4254.94 1518.41,4304.94
  Bottom Layer w20: U18.8@1648.07,4604.94 v1(1705,4604.94)
  other v1: 209.63,4479.16 243.09,4479.44 276.54,4479.72 310,4480 343.46,4480.28 376.91,4480.56 209.63,4509.16 243.09,4509.44 276.54,4509.72 310,4510 343.46,4510.28 376.91,4510.56 209.63,4539.16 243.09,4539.44 276.54,4539.72 310,4540 343.46,4540.28 376.91,4540.56
GSM_CTS: U15.12
GSM_DCD: U15.18
GSM_DTR: U15.14
GSM_PWR: Q4.2 R117.1 | length 47.4
  Top Layer w15: Q4.2@4108.23,3346.55 R117.1@4155.67,3346.56
GSM_RI: U15.15
GSM_RST: Q5.2 U1.42 | length 4379.2
  Top Layer w7: v1(1752.15,2157.36) 1815.21,2157.36 U1.42@1882.2,2224.35 ; v1(2740.16,2903.39) 2740.16,2809.33 ccw(c2761.48,2809.33) 2761.48,2788 4144,2788 ccw(c4144,2854) 4210,2854 4210,3237.26 ccw(c4187.32,3237.26) 4187.32,3259.94 Q5.2@4108.23,3259.94
  Bottom Layer w10: v1@1749.15,2159.86 1570.9,2159.86 cw(c1570.9,2177.76) 1553,2177.76 1553,2881.33 cw(c1575.05,2881.33) 1575.05,2903.39 v1(2740.16,2903.39)
GSM_RTS: U15.13
HPVCCBP: C11.2 C12.2 U1.123 | length 160.5
  Top Layer w7: v1(2209.28,2640.52) U1.123@2260.79,2692.02
  Bottom Layer w15: v1@2209.32,2640.52 C12.2@2243.76,2674.96 ; C11.2@2215.67,2702.04 C12.2@2243.26,2674.46
HUB_XI: C109.2 R93.1 U13.38 X4.1 | length 462.4
  Top Layer w10: U13.38@3011.62,1512.96 3037.6,1512.4 3052.18,1512.09 cw(c3051.97,1502.09) 3052.3,1512.09 cw(c3051.04,1482.42) 3072.05,1503.41 cw(c2991.28,1422.61) 3093.62,1473.39 R93.1@3106.12,1463.39 3118.29,1453.39 ccw(c3157.29,1498.66) 3157.29,1438.91 3270.16,1438.91 cw(c3270.16,1423.61) 3285.46,1423.61 X4.1@3285.46,1363.43 3267.07,1345.05 3267.07,1282.95 C109.2@3264.92,1280.79
HUB_XO: C110.2 R93.2 U13.39 X4.3 | length 260.2
  Top Layer w7: X4.3@3190.98,1524.86 X4.3@3204.92,1538.8
  Top Layer w10: U13.39@3011.11,1532.15 R93.2@3096.12,1532.15 ; R93.2@3106.12,1523.39 3114.89,1532.15 3183.68,1532.15 X4.3@3190.98,1524.86 ; X4.3@3204.92,1538.8 C110.2@3204.92,1602.8
I2C0_SCL: R18.2 U1.45 U3.6 U11.10 | length 3547.1
  Top Layer w7: U11.10@271.68,3013.57 273.12,3015 v1(809,3015) ; U3.6@565.76,1595.92 660,1595.92 ccw(c660,1614.92) 679.01,1614.92 679.01,1805.09 cw(c699.83,1805.09) 699.83,1825.91 747.57,1825.91 ccw(c747.57,1843.34) 765,1843.34 765,2318.19 cw(c780.12,2318.19) 780.12,2333.31 v1(809,2333.31) 1448.47,2333.31 1695.56,2086.22 1810.91,2086.22 U1.45@1915.62,2190.93 1951.62,2226.93 ccw(c1946.74,2231.81) 1951.62,2236.69 v1(1938.22,2250.08)
  Bottom Layer w7: v1(809,2333.31) v1(809,3015)
  Bottom Layer w15: R18.2@1907.53,2217.81 1907.53,2219.58 v1@1938.03,2250.08
I2C0_SDA: R19.2 U1.46 U3.5 U11.9 | length 3596.3
  Top Layer w7: U11.9@271.68,2993.88 v1(836,2993.88) ; U3.5@565.76,1645.92 565.76,1822.49 cw(c585.72,1822.49) 585.72,1842.45 725.94,1842.45 ccw(c725.94,1861.52) 745,1861.52 745,2358.26 cw(c761.46,2358.26) 761.46,2374.73 v1(836,2374.73) 1467.8,2374.73 v1(1718.45,2124.08) ; v1@1717.39,2064.25 v1(1718.45,2064.25) 1811.18,2064.25 U1.46@1926.74,2179.81 ; U1.46@1926.74,2179.81 v1@1978.8,2231.84
  Bottom Layer w7: v1(836,2374.73) v1(836,2993.88)
  Bottom Layer w10: v1(1718.45,2064.25) v1(1718.45,2124.08)
  Bottom Layer w15: R19.2@1937.21,2188.13 1937.21,2190.25 v1@1978.61,2231.65
  other v1: 1978.99,2231.65
KEYADC0: C26.2 D10.2 R11.1 R13.1 U1.112 | length 3034.5
  Top Layer w7: v1(2342.4,2528.66) U1.112@2383.28,2569.53
  Top Layer w15: R11.1@1685.04,1054.45 R13.1@1748.03,1054.45 D10.2@1748.03,998.8
  Top Layer w20: D10.2@1750.31,998.52 1785.71,998.52 v1@1785.76,998.47
  Bottom Layer w10: v1@1785.85,998.52 1785.85,2215.47 ccw(c1757.1,2215.47) 1757.1,2244.22 1635.16,2244.22 cw(c1635.16,2264.38) 1615,2264.38 1615,2768.05 cw(c1641.58,2768.05) 1641.58,2794.63 1971.97,2794.63 cw(c1971.97,2704.06) 2019.46,2781.19 cw(c1971.97,2704.06) 2036.01,2768.1 cw(c1869,2573.73) 2050.44,2754.71 2050.66,2754.49 2298.24,2506.91 ccw(c2309.95,2518.51) 2321.62,2506.88 v1@2342.9,2528.15 ; v1@2342.73,2528.32 2362.68,2548.26 C26.2@2366.93,2551.78
  other v1: 1785.99,998.25
LCD_CLK: J4.30 U1.37 | length 2184
  Top Layer w7: J4.30@52.95,2588.58 76.45,2588.58 cw(c76.45,2572.45) 87.85,2583.86 v1(98.24,2573.47) ; v1(758.44,2417.15) 1519.86,2417.15 1694.1,2242.91 1789.41,2242.91 U1.37@1826.52,2280.02
  Bottom Layer w7: v1(98.24,2573.47) 98.24,2346.76 ccw(c122,2346.76) 122,2323 742,2323 ccw(c742,2339.44) 758.44,2339.44 v1@758.44,2407.15
LCD_D2: J4.23 U1.33 | length 1823.4
  Top Layer w7: J4.23@52.95,2450.79 136.6,2450.79 ccw(c136.6,2497.49) 169.62,2464.47 199.69,2494.53 ; 199.7,2494.55 cw(c227.65,2466.57) 227.65,2506.11 244.03,2506.11 1600.43,2506.11 U1.33@1781.97,2324.57
LCD_D3: J4.24 U1.32 | length 1796.1
  Top Layer w7: J4.24@52.95,2470.47 130.27,2470.47 ccw(c130.27,2517.21) 163.3,2484.14 ; 163.32,2484.16 187.31,2508.15 cw(c221.62,2473.89) 221.62,2522.38 1662.09,2522.38 U1.32@1781.97,2402.49
LCD_D4: J4.25 U1.31 | length 1839.1
  Top Layer w7: J4.25@52.95,2490.16 125.59,2490.16 ccw(c125.59,2536.86) 158.62,2503.84 217.29,2562.51 cw(c250.31,2529.48) 250.31,2576.19 1630.56,2576.19 1632.61,2574.14 U1.31@1793.11,2413.63
LCD_D5: J4.26 U1.30 | length 1850
  Top Layer w7: J4.26@52.95,2509.84 122.74,2509.84 ccw(c122.74,2546.05) 148.32,2520.42 ; 148.34,2520.44 205.68,2577.78 cw(c236.64,2546.88) 236.64,2590.63 1638.39,2590.63 U1.30@1804.25,2424.77
LCD_D6: J4.27 U1.28 | length 1866.4
  Top Layer w7: J4.27@52.95,2529.53 118.04,2529.53 ccw(c118.04,2566.03) 143.84,2540.22 195,2591.37 cw(c227,2559.38) 227,2604.63 250.31,2604.63 1668.94,2604.63 1670.99,2602.58 U1.28@1826.52,2447.04
LCD_D7: J4.28 U1.27 | length 1876.6
  Top Layer w7: J4.28@52.95,2549.21 115.32,2549.22 ccw(c115.32,2579.95) 137.03,2558.2 ; 137.05,2558.22 183.46,2604.63 ; 183.49,2604.66 cw(c217.56,2570.52) 217.56,2618.75 250.31,2618.75 1677.08,2618.75 1679.13,2616.7 U1.27@1837.66,2458.18
LCD_D10: J4.15 U1.24 | length 2252
  Top Layer w7: J4.15@52.95,2293.31 497.21,2293.31 ccw(c497.21,2307.83) 511.73,2307.83 v1(511.73,2450.78) ; v1@510,2661.03 510.59,2661.62 1701.04,2661.62 U1.24@1871.07,2491.59
  Bottom Layer w7: v1(511.73,2450.78) v1(511.73,2661.03)
LCD_D11: J4.16 U1.23 | length 2264.7
  Top Layer w7: J4.16@52.95,2312.99 460.43,2312.99 ccw(c460.43,2329.05) 476.49,2329.05 v1(476.49,2450.78) ; v1(476.49,2681.35) 1703.57,2681.35 U1.23@1882.2,2502.72
  Bottom Layer w7: v1(476.49,2450.78) v1(476.49,2681.35)
LCD_D12: J4.17 U1.22 | length 2282.8
  Top Layer w7: J4.17@52.95,2332.68 54.26,2331.37 426.79,2331.37 ccw(c426.79,2345.83) 441.24,2345.83 v1(441.24,2450.78) ; v1(441.24,2701.66) 1705.55,2701.66 U1.22@1893.34,2513.86
  Bottom Layer w7: v1(441.24,2450.78) v1(441.24,2701.66)
LCD_D13: J4.18 U1.18 | length 2300.5
  Top Layer w7: J4.18@52.95,2352.36 v1(195,2352.36) ; v1(285.51,2701.66) cw(c337,2650.17) 337,2722.98 928.8,2722.98 1773.29,2722.98 U1.18@1937.88,2558.4
  Bottom Layer w7: v1(195,2352.36) 267.71,2352.36 ccw(c267.71,2370.16) 285.51,2370.16 v1(285.51,2701.66)
LCD_D14: J4.19 U1.17 | length 2334.3
  Top Layer w7: J4.19@52.95,2372.05 54.04,2373.14 393.17,2373.14 ccw(c393.17,2385.97) 406,2385.97 v1(406,2450.78) ; v1(406,2744.1) 928.8,2744.1 1774.45,2744.1 U1.17@1949.01,2569.53
  Bottom Layer w7: v1(406,2450.78) v1(406,2744.1)
LCD_D15: J4.20 U1.16 | length 2352.3
  Top Layer w7: J4.20@52.95,2391.73 357.86,2391.73 ccw(c357.86,2404.62) 370.76,2404.62 v1(370.76,2450.78) ; v1(370.76,2765.75) 1775.06,2765.75 U1.16@1960.14,2580.66
  Bottom Layer w7: v1(370.76,2450.78) v1(370.76,2765.75)
LCD_D18: J4.7 U1.15 | length 2685.2
  Top Layer w7: J4.7@52.95,2135.83 150.95,2135.83 cw(c150.95,2089.09) 184,2122.14 ; 184.67,2121.46 ccw(c236.49,2173.28) 236.49,2100 703.2,2100 ccw(c703.2,2120) 723.2,2120 v1(723.2,2450.78) ; v1(723.2,2786.06) 723.46,2786.33 1774.9,2786.33 1949.26,2611.96 1950.5,2611.96 1970.66,2591.8 U1.15@1971.28,2591.8
  Bottom Layer w7: v1(723.2,2450.78) v1(723.2,2786.06)
LCD_D19: J4.8 U1.14 | length 2694.8
  Top Layer w7: J4.8@52.95,2155.51 155.35,2155.51 cw(c155.35,2094.89) 198.21,2137.75 ; 198.25,2137.72 ccw(c241.07,2180.62) 241.07,2120 668.2,2120 ccw(c668.2,2139.75) 687.95,2139.75 v1(687.95,2450.78) ; v1(687.95,2806.64) 1778.72,2806.64 U1.14@1982.42,2602.94
  Bottom Layer w7: v1(687.95,2450.78) v1@687.95,2800
LCD_D20: J4.9 U1.13 | length 2669.4
  Top Layer w7: J4.9@54.04,2176.29 631.07,2176.29 ccw(c631.07,2197.92) 652.71,2197.92 v1(652.71,2450.78) ; v1(652.71,2827.22) 1780.38,2827.22 U1.13@1993.54,2614.06
  Bottom Layer w7: v1(652.71,2450.78) v1(652.71,2827.22)
LCD_D21: J4.10 U1.11 | length 2695.2
  Top Layer w7: J4.10@52.95,2194.88 598.44,2194.88 ccw(c598.44,2213.9) 617.46,2213.9 v1(617.46,2450.78) ; v1(617.46,2847.8) 1804.35,2847.8 U1.11@2015.81,2636.34
  Bottom Layer w7: v1(617.46,2450.78) v1(617.46,2847.8)
LCD_D22: J4.11 U1.7 | length 2793.6
  Top Layer w7: J4.11@52.95,2214.57 561.12,2214.57 ccw(c561.12,2235.67) 582.22,2235.67 v1(582.22,2450.78) ; v1(582.22,2913.51) 1827.74,2913.51 U1.7@2060.36,2680.88
  Bottom Layer w7: v1(582.22,2450.78) v1(582.22,2913.51)
LCD_D23: J4.12 U1.6 | length 2808.9
  Top Layer w7: J4.12@52.95,2234.25 524.11,2234.25 ccw(c524.11,2257.11) 546.98,2257.11 v1(546.98,2450.78) ; v1(546.98,2934.16) 1829.36,2934.16 U1.6@2071.5,2692.02
  Bottom Layer w7: v1(546.98,2450.78) v1(546.98,2934.16)
LCD_DE: J4.34 U1.36 | length 2053.5
  Top Layer w7: J4.34@52.95,2667.32 422.4,2667.32 cw(c422.4,2620.76) 455.31,2653.69 ; 455.35,2653.65 ccw(c488.24,2686.6) 488.24,2640.04 v1(758.44,2640.04) ; v1(758.44,2450.78) 1513.79,2450.78 1707.66,2256.91 1781.13,2256.91 U1.36@1815.38,2291.16
  Bottom Layer w7: v1(758.44,2450.78) v1(758.44,2640.04)
LCD_HSYNC: J4.32 U1.35 | length 2108.6
  Top Layer w7: J4.32@52.95,2627.95 148.34,2627.95 v1(150.61,2625.68) ; v1(195,2413) 330.17,2413 ccw(c330.17,2429.23) 346.4,2429.23 346.4,2462.44 cw(c360.99,2462.44) 360.99,2477.03 370.76,2477.03 1515.1,2477.03 1721.21,2270.91 1772.86,2270.91 U1.35@1804.25,2302.3
  Bottom Layer w7: v1(150.61,2625.68) 182.28,2625.68 cw(c182.28,2612.96) 195,2612.96 v1(195,2413)
LCD_PB2: R83.2 U1.41 | length 1331.6
  Top Layer w7: v1(785.53,2396) 1489,2396 1706.96,2178.04 1813.63,2178.04 U1.41@1871.07,2235.48
  Bottom Layer w7: R83.2@785.53,2266.33 v1(785.53,2396) ; R83.2@788.44,2266.31 cw(c789.89,2266.31) R83.2@789.89,2267.76
LCD_VSYNC: J4.33 U1.34 | length 2084.3
  Top Layer w7: J4.33@53.05,2647.54 v1@213.22,2647.54 ; v1(230.45,2434.84) 230.45,2473.93 cw(c247.55,2473.93) 247.55,2491.03 266.22,2491.03 1528.66,2491.03 1734.35,2285.33 1765.01,2285.33 U1.34@1793.11,2313.43
  Bottom Layer w7: v1@212.23,2645.64 213.23,2644.64 213.23,2476.4 ccw(c272,2476.4) v1(230.45,2434.84)
  other v1: 213.22,2646.85
M_RST: R118.2 U18.6 | length 598.9
  Top Layer w10: R118.2@1165.68,4546 1165.68,4574.6 cw(c1183.48,4574.6) 1183.48,4592.4 v1(1367.5,4592.4)
  Bottom Layer w10: v1(1367.5,4592.4) 1367.5,4527.56 ccw(c1390.12,4527.56) 1390.12,4504.94 U18.6@1648.07,4504.94
MB_RXD: J10.5
MB_TXD: J10.6
MCU_RST: U1.44 U18.11 | length 4845.7
  Top Layer w7: v1(946.37,2354) 1453.22,2354 1706.9,2100.32 1802.7,2100.32 U1.44@1904.47,2202.08
  Bottom Layer w10: v1(946.37,2354) 946.37,2934.16 cw(c986.37,2934.16) 986.37,2974.15 1802.16,2974.15 ccw(c1802.16,3007) 1835,3007 1835,3335 cw(c1858,3335) 1858,3358 2281.79,3358 ccw(c2281.79,3392.08) 2315.87,3392.08 2315.87,4485.65 ccw(c2296.58,4485.65) 2296.58,4504.94 U18.11@2031.93,4504.94
NET_MODE: Q3.2 U14.5 | length 4390.5
  Top Layer w10: Q3.2@1364.81,722.44 1364.9,722.34 1364.9,661.61 ccw(c1404.19,661.61) 1383.04,628.5 v1(1404.19,615)
  Top Layer w15: v1(2996.08,2929.05) U14.5@2996.06,3001.97
  Bottom Layer w10: v1(1404.19,615) 1652.87,615 ccw(c1652.87,652.13) 1690,652.13 1690,2107.46 ccw(c1667.59,2107.46) 1667.59,2129.87 1544.4,2129.87 cw(c1544.4,2149.95) 1524.32,2149.95 1524.32,2903.71 cw(c1549.65,2903.71) 1549.65,2929.05 v1(2996.08,2929.05)
NET_STATUS: Q2.2 U14.6 | length 4872.6
  Top Layer w10: Q2.2@1364.81,328.74 1364.81,250.49 v1(1364.9,250.4)
  Top Layer w15: v1(3047.24,2913.39) U14.6@3047.24,3001.97
  Bottom Layer w10: v1(1364.9,250.4) 1364.9,615 cw(c1389.9,615) 1389.9,640 1645,640 ccw(c1645,662.59) 1667.59,662.59 1667.59,2087.49 ccw(c1647.62,2087.49) 1647.62,2107.46 1524.32,2107.46 cw(c1524.32,2133.13) 1498.65,2133.13 1498.65,2927.48 cw(c1525.06,2927.48) 1525.06,2953.89 3030.35,2953.89 cw(c3030.35,2937) 3047.24,2937 v1(3047.24,2913.39)
NetC8_1: C8.1 R12.2 | length 191.4
  Top Layer w25: C8.1@300.78,1578.74 300.78,1520 ccw(c324.66,1520) 324.66,1496.12 R12.2@419.77,1496.12
NetC10_2: C10.2 U3.1 X3.1 | length 184.4
  Top Layer w10: U3.1@778.35,1495.92 836.5,1495.92 cw(c836.5,1471.1) 854.48,1488.21 856.78,1485.79 X3.1@887.21,1471.1 ccw(c887.21,1452.93) 869.04,1452.93 C10.2@869.04,1412.46
NetC53_1: C53.1 R39.2 | length 55.5
  Bottom Layer w20: R39.2@348.98,3006.51 349.48,3007.01 403.6,3007.01 C53.1@404.1,3007.51
NetC53_2: C53.2 L1.1 U5.5 | length 2.5
  Bottom Layer w8: C53.2@401.6,3067.51 C53.2@404.1,3067.51
NetC54_1: C54.1 R42.2 | length 52.9
  Top Layer w20: C54.1@984.33,4197.36 R42.2@1037.22,4197.36
NetC54_2: C54.2 L2.1 U6.26
NetC56_2: C56.2 U5.7 | length 95.1
  Bottom Layer w8: C56.2@293.86,3067.51 307.36,3076.44 ccw(c278.99,3094.16) 312.44,3094.16 312.44,3098.47 U5.7@312.44,3154.42
NetC62_1: C62.1 R49.2 U6.23 | length 251.6
  Top Layer w8: C62.1@1255.54,4136.36 1255.54,4135.36 1255.54,4072.15 1323.44,4004.25 1323.44,3987.53 U6.23@1308.58,3972.67
  Top Layer w20: R49.2@1200.94,4137.36 C62.1@1254.54,4137.36
NetC63_1: C63.1 R49.1 | length 55.9
  Top Layer w20: C63.1@1145,4196.36 R49.1@1200.94,4196.36
NetC65_1: C65.1 R52.2 | length 55.9
  Top Layer w20: C65.1@1402.64,3413.58 R52.2@1402.64,3469.44
NetC65_2: C65.2 L3.1 U6.10 | length 61
  Top Layer w8: L3.1@1515.75,3407.64 L3.1@1515.75,3468.67
NetC69_1: C69.1 R56.1 U6.7 | length 332.8
  Top Layer w8: R56.1@1228.85,3470.12 R56.1@1229.53,3469.44 ; C69.1@1228.85,3525.23 1228.85,3527.73 1194.12,3562.46 1194.12,3718.94 U6.7@1242.6,3767.49 U6.7@1242.6,3767.49
  Top Layer w15: R56.1@1228.85,3470.12 C69.1@1228.85,3525.23
NetC70_1: C70.1 R56.2 | length 55.9
  Top Layer w20: C70.1@1289.53,3413.58 R56.2@1289.53,3469.44
NetC71_2: C71.2 U6.24 | length 297.4
  Top Layer w8: C71.2@1091.11,4136.36 1091.11,4081.99 1102.39,4070.71 1210.53,4070.71 U6.24@1294.66,3986.59
NetC72_1: C72.1 R57.2 | length 55.9
  Top Layer w20: C72.1@1649.92,3798.15 R57.2@1649.92,3854.08
NetC72_2: C72.2 L4.1 U6.15
NetC74_2: C74.2 U6.8 | length 181
  Top Layer w8: C74.2@1228.85,3584 1228.85,3725.91 U6.8@1256.52,3753.58
NetC75_1: C75.1 R58.2 | length 56.7
  Top Layer w15: R58.2@2419.53,4218.09 C75.1@2476.26,4218.09
NetC75_2: C75.2 L5.1 U7.2 | length 542.3
  Top Layer w10: L5.1@2118.07,4315.21 ccw(c2126.54,4315.21) 2126.54,4306.74 L5.1@2181.64,4306.74 ; U7.2@2283.88,4306.74 L5.1@2181.64,4306.74 ; C75.2@2476.26,4278.09 2476.26,4257.34 cw(c2467.01,4257.34) 2467.01,4248.09 2199.42,4248.09 cw(c2199.42,4265.86) 2181.64,4265.86 L5.1@2181.64,4306.74
NetC84_2: C84.2 U6.17 | length 206.5
  Top Layer w8: U6.17@1392.09,3889.15 1412.97,3910.02 C84.2@1589.92,3910.02
NetC85_1: C85.1 R65.1 U6.18 | length 314.5
  Top Layer w8: U6.18@1378.18,3903.07 1497,4021.9 R65.1@1589.92,4021.9
  Top Layer w20: C85.1@1591.13,3967.16 R65.1@1591.13,4020.68
NetC86_1: C86.1 R65.2 | length 56
  Top Layer w20: R65.2@1649.92,4021.9 C86.1@1649.92,4077.83
NetC99_2: C99.2 U13.11 | length 239.2
  Top Layer w10: C99.2@2631.5,1896.22 2631.5,1846.65 ccw(c2646.06,1846.65) 2646.06,1832.09 2740.96,1832.09 cw(c2740.96,1817.85) 2755.2,1817.85 2755.2,1794.87 U13.11@2755.2,1768.37
NetC137_2: C137.2 D15.1 J5.1 R101.1 | length 174.7
  Top Layer w13.5: R101.1@3046.56,4408.27 3046.56,4581.99 J5.1@3047.24,4582.68
NetC141_2: C141.2 D16.1 J6.1 R109.1 | length 169.9
  Top Layer w7: J6.1@4187.68,4065.93 J6.1@4187.68,4066.62
  Top Layer w13.5: R109.1@4018.5,4065.93 J6.1@4187.68,4065.93
NetC144_1: C144.1 C145.2 R113.1 | length 81.2
  Top Layer w7: R113.1@3271.34,4408.27 R113.1@3271.65,4408.58
  Top Layer w13.5: R113.1@3271.65,4408.58 C144.1@3271.65,4489.38
NetC144_2: C144.2 J8.1 L7.2 | length 107
  Top Layer w7: L7.2@3321.65,4526.38 L7.2@3322.83,4527.56
  Top Layer w13.5: J8.1@3271.65,4581.69 C144.2@3271.65,4526.38 L7.2@3321.65,4526.38
NetC151_1: C151.1 U20.6
NetC151_2: C151.2 L8.1 U20.5
NetD9_2: D9.2 R12.1 U3.8 | length 141.1
  Top Layer w15: D9.2@479.64,1550.94 479.77,1550.94 R12.1@479.77,1496.12 479.77,1495.92 U3.8@565.76,1495.92
NetD11_2: D11.2 R112.1 | length 125.7
  Top Layer w13.5: R112.1@3429.13,4477.88 3429.13,4423.47 ccw(c3440.94,4423.47) 3440.94,4411.66 D11.2@3493.68,4411.66
NetL6_2: L6.2 U12.6
NetL7_1: L7.1 R112.2 | length 55.5
  Top Layer w13.5: L7.1@3377.95,4527.56 3385.79,4535.4 3426.66,4535.4 R112.2@3429.13,4537.88
NetLED1_2: LED1.2 R77.1 | length 122.6
  Top Layer w20: R77.1@540,763.78 LED1.2@662.6,763.78
NetLED2_1: LED2.1 R78.1 | length 81.1
  Top Layer w20: R78.1@1141.73,3136.3 v1(1141.73,3177.87)
  Bottom Layer w20: v1(1141.73,3177.87) LED2.1@1141.73,3217.39
NetLED3_1: LED3.1 R79.1 | length 81.1
  Top Layer w20: R79.1@1220.47,3136.3 v1(1220.47,3177.87)
  Bottom Layer w20: v1(1220.47,3177.87) LED3.1@1220.47,3217.39
NetLED4_1: LED4.1 R80.1 | length 81.1
  Top Layer w20: R80.1@1299.21,3136.3 v1(1299.21,3177.87)
  Bottom Layer w20: v1(1299.21,3177.87) LED4.1@1299.21,3217.39
NetLED5_1: LED5.1 R81.1 | length 76.7
  Top Layer w20: v1(1377.95,3177.87) R81.1@1377.95,3215
  Bottom Layer w20: v1(1377.95,3177.87) LED5.1@1377.95,3217.39
NetLED5_2: LED5.2 Q8.3 | length 197.8
  Bottom Layer w20: LED5.2@1377.95,3279.92 Q8.3@1377.95,3477.69
NetLED6_1: LED6.1 Q2.3 | length 108.1
  Top Layer w20: LED6.1@1274.41,370.08 Q2.3@1382.5,370.08
NetLED6_2: LED6.2 R97.1 | length 124.4
  Top Layer w20: R97.1@1050,370.08 LED6.2@1174.41,370.08
NetLED7_1: LED7.1 Q3.3 | length 108.1
  Top Layer w20: LED7.1@1274.41,763.78 Q3.3@1382.5,763.78
NetLED7_2: LED7.2 R98.1 | length 122.6
  Top Layer w20: R98.1@1051.81,763.78 LED7.2@1174.41,763.78
NetLED8_1: LED8.1 R114.1 | length 61.3
  Bottom Layer w7: R114.1@2677.16,3812.52 ccw(c2680.69,3812.52) R114.1@2680.69,3808.99
  Bottom Layer w15: R114.1@2680.69,3808.99 LED8.1@2736.49,3808.99
NetLED9_1: 
NetLED10_1: LED10.1 R120.1 | length 83.6
  Bottom Layer w15: R120.1@683.02,598.51 LED10.1@766.65,598.51
NetLED10_2: LED10.2 Q6.3 | length 158.7
  Bottom Layer w10: LED10.2@766.65,539.46 LED10.2@766.71,539.39
  Bottom Layer w15: LED10.2@766.71,539.39 Q6.3@925.34,539.33
NetLED11_1: LED11.1 Q7.3 | length 108.1
  Top Layer w20: LED11.1@762.6,370.08 Q7.3@870.69,370.08
NetLED11_2: LED11.2 R121.1 | length 122.6
  Top Layer w20: R121.1@540,370.08 LED11.2@662.6,370.08
NetLS1_2: LS1.2 Q1.3 | length 140.5
  Top Layer w30: Q1.3@3537.95,945.12 LS1.2@3678.44,945.12
NetQ1_1: Q1.1 R17.2 | length 49
  Top Layer w20: R17.2@3496.93,817.36 Q1.1@3496.93,866.38
NetQ8_1: Q8.1 R128.2 | length 137.3
  Bottom Layer w20: Q8.1@1340.55,3556.43 1340.55,3600.85 cw(c1360.02,3600.85) 1360.02,3620.32 R128.2@1422.35,3620.32
NetQ9_1: Q9.1 R83.1 | length 95.4
  Bottom Layer w15: Q9.1@630.48,2267.4 ccw(c631.55,2267.4) 631.55,2266.33 R83.1@725.24,2266.33
NetQ9_3: Q9.3 SB1.2 | length 110
  Bottom Layer w15: SB1.2@551.74,2120 Q9.3@551.74,2230
NetR9_1: R9.1 U1.94 | length 122.1
  Top Layer w7: v1@2476,2354.34 U1.94@2528.04,2302.3
  Bottom Layer w7: R9.1@2510.85,2320.49 R9.1@2510.85,2320.87
  Bottom Layer w15: v1(2476.19,2354.53) R9.1@2510.23,2320.49
NetR13_2: R13.2 R14.1 SW3.3 SW3.4 | length 887.8
  Top Layer w10: 1836.61,986.99 ccw(c1839.33,986.99) 1839.33,984.27
  Top Layer w15: R13.2@1748.03,1091.45 1814.58,1091.45 SW3.3@1836.61,1057.08
  Top Layer w20: 1834.96,968 2153.05,968 ccw(c2153.05,996.05) 2181.1,996.05 R14.1@2181.1,1051.82
  Top Layer w30: SW3.4@1836.61,698.82 1836.61,986.99 SW3.3@1836.61,1057.08
NetR14_2: R14.2 R15.1 SW4.3 SW4.4 | length 887.2
  Top Layer w10: 2269.68,987.88 ccw(c2271.99,987.88) 2271.99,985.57
  Top Layer w15: R14.2@2181.1,1091.45 2247.65,1091.45 SW4.3@2269.68,1057.09
  Top Layer w20: 2271.96,968 2590.05,968 ccw(c2590.05,996.05) 2618.11,996.05 R15.1@2618.11,1051.82
  Top Layer w30: SW4.4@2269.68,698.83 2269.68,985.57 2269.68,987.88 SW4.3@2269.68,1057.09